# Altium PCB Buck.PcbDoc
Units mm, origin at the board's own origin, x right, y up, seen from the top; angles counter-clockwise.
Board outline 93.22 x 41.27 mm, 4 copper layers (Top Layer, Layer 1, Layer 2, Bottom Layer), stack 1.575 mm thick; 46 components, 20 nets, 113 pads, 11 vias.
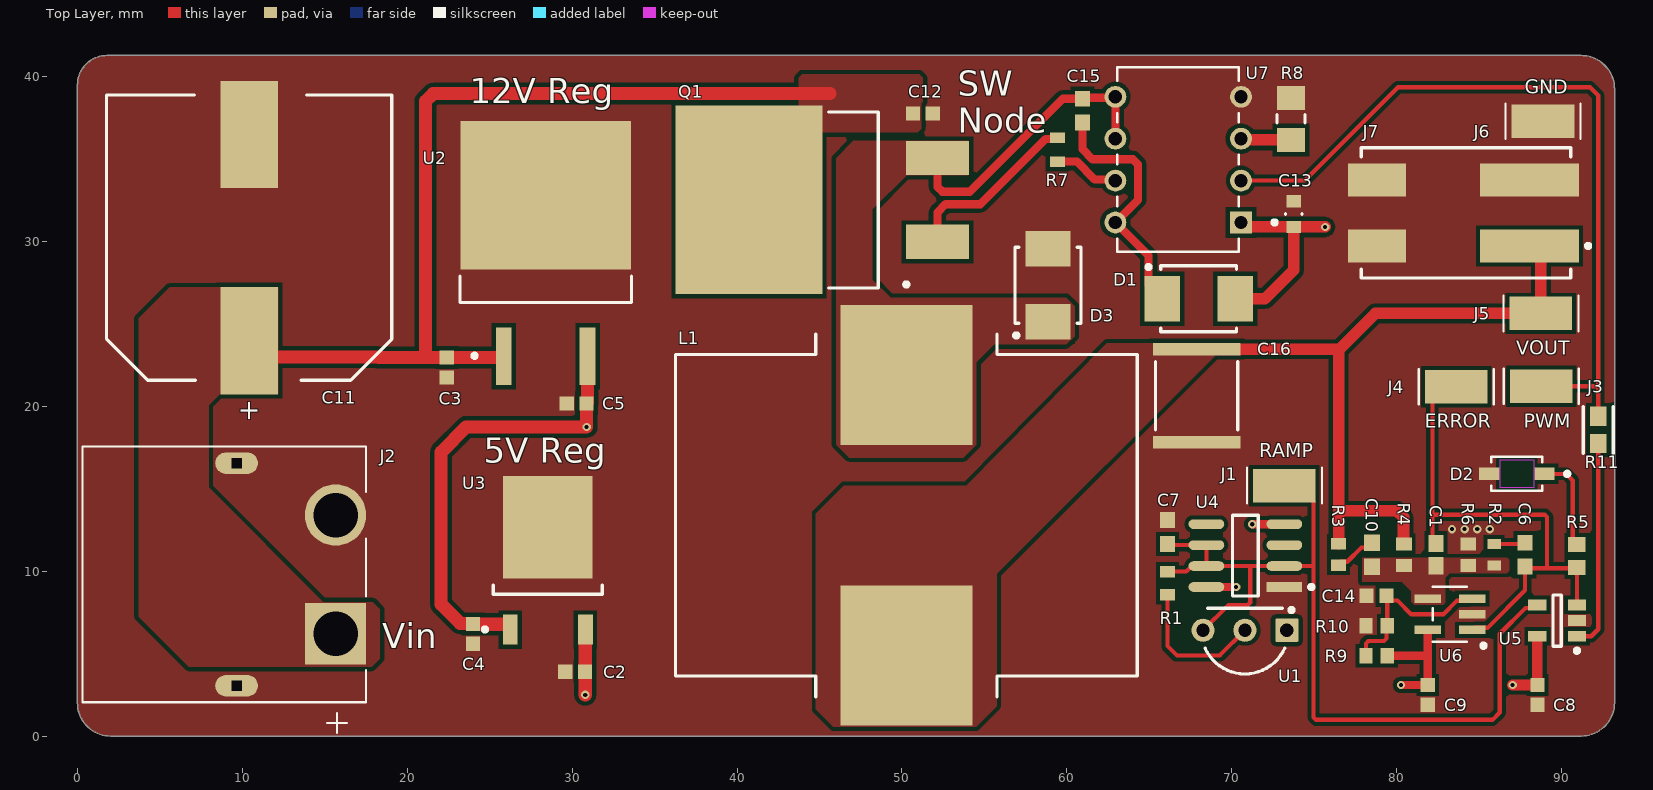
[diagram p0: Top Layer view]
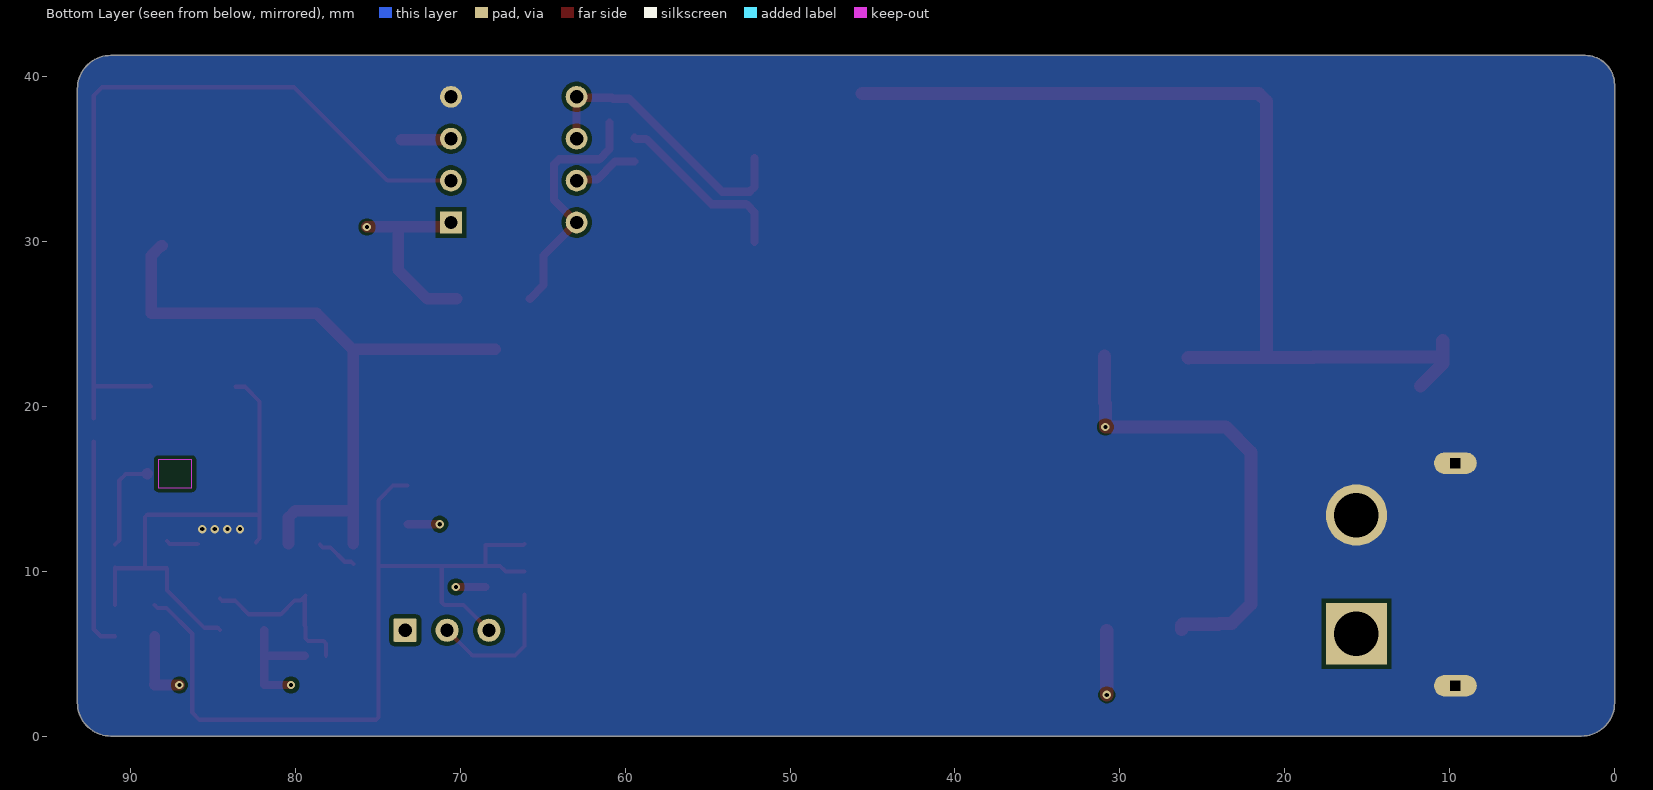
[diagram p1: Bottom Layer view, seen from below]
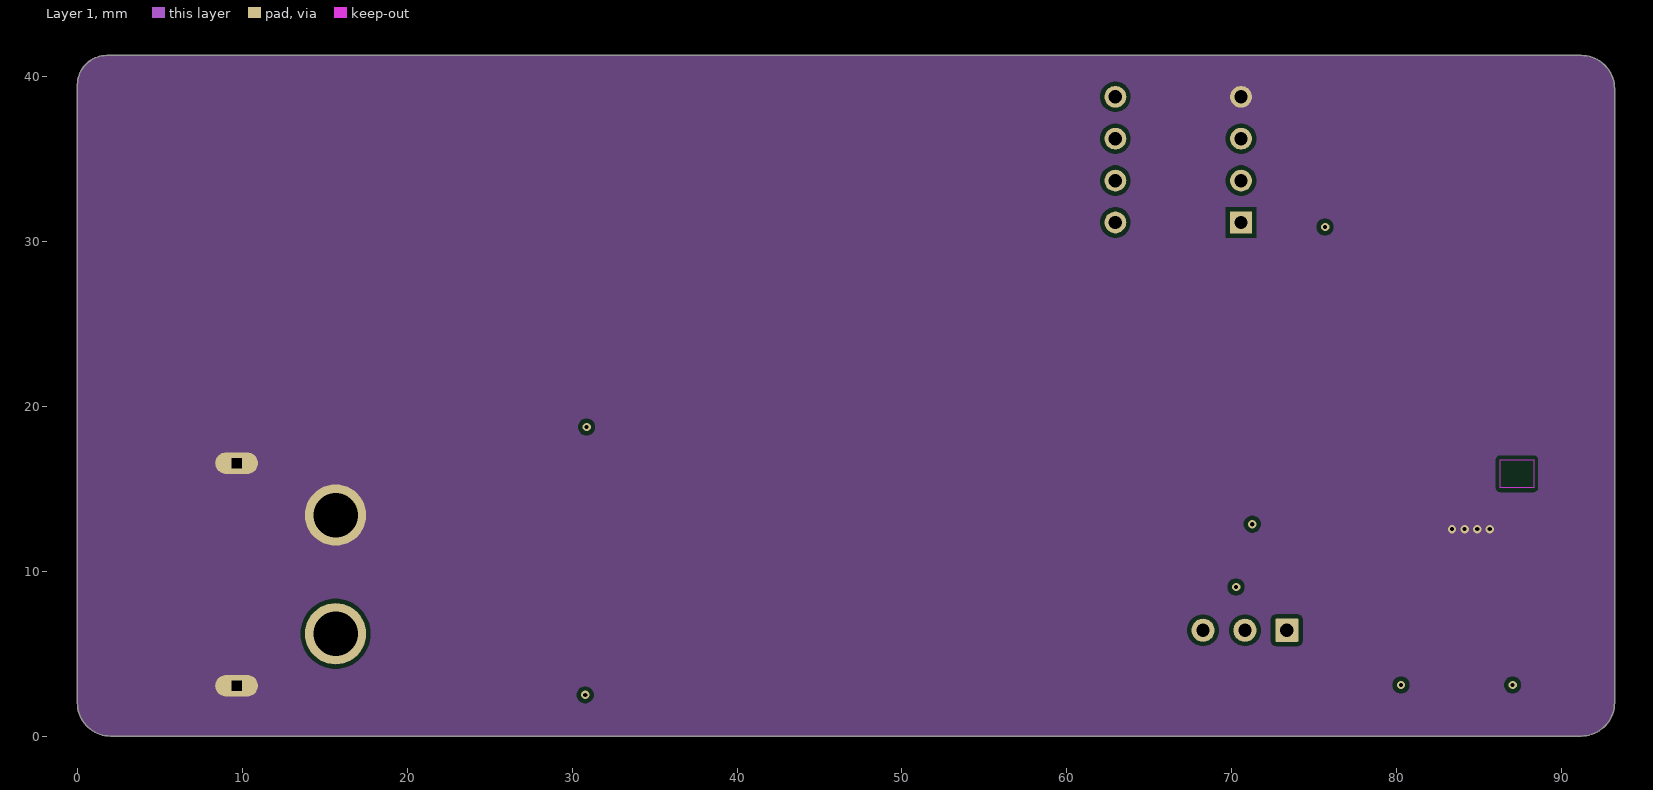
[diagram p2: Layer 1]
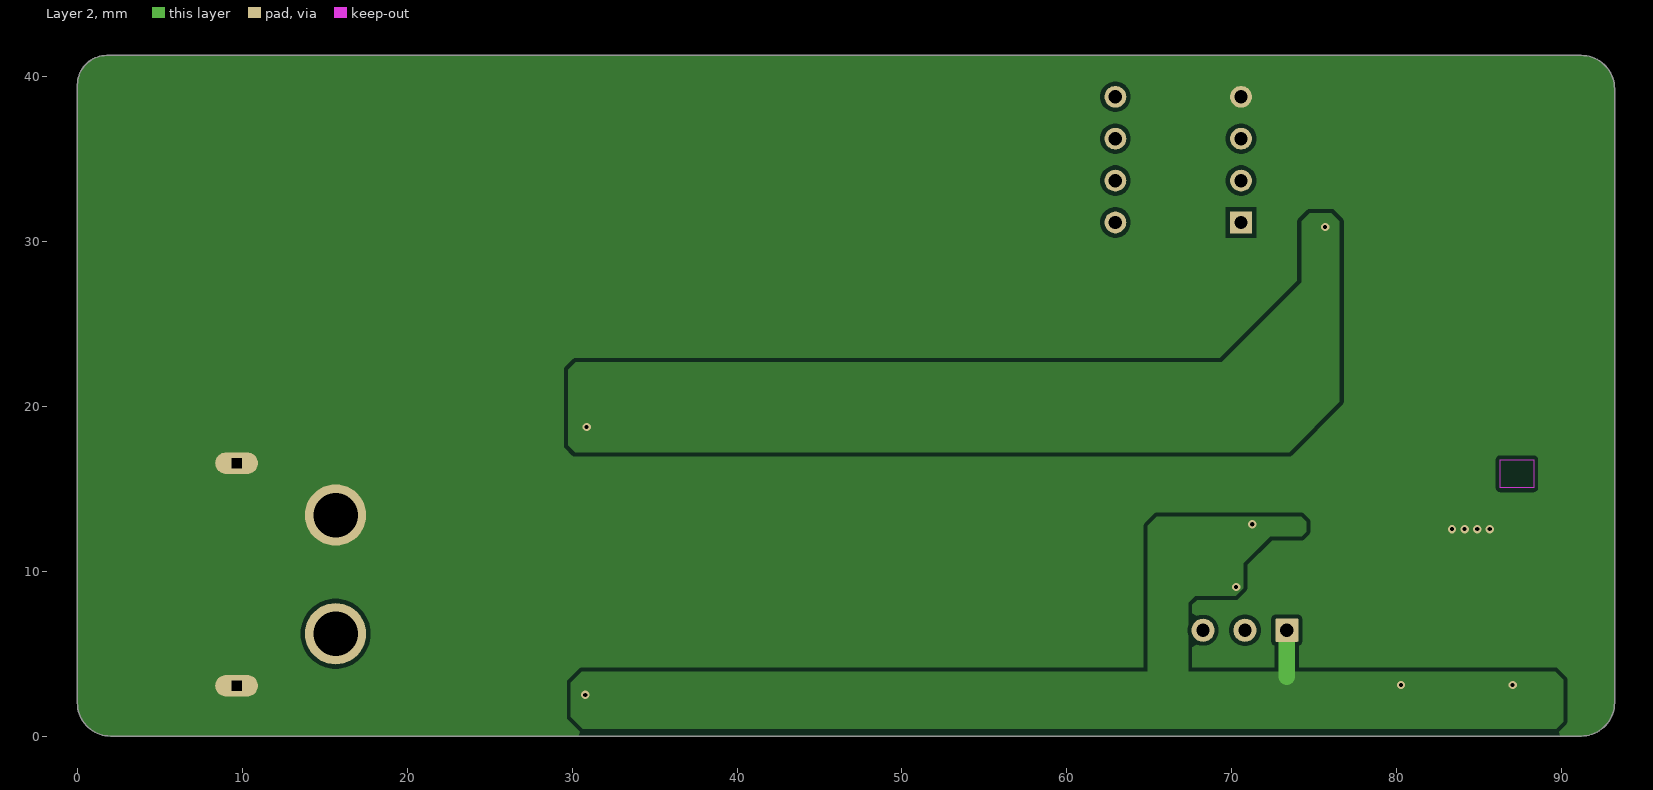
[diagram p3: Layer 2]
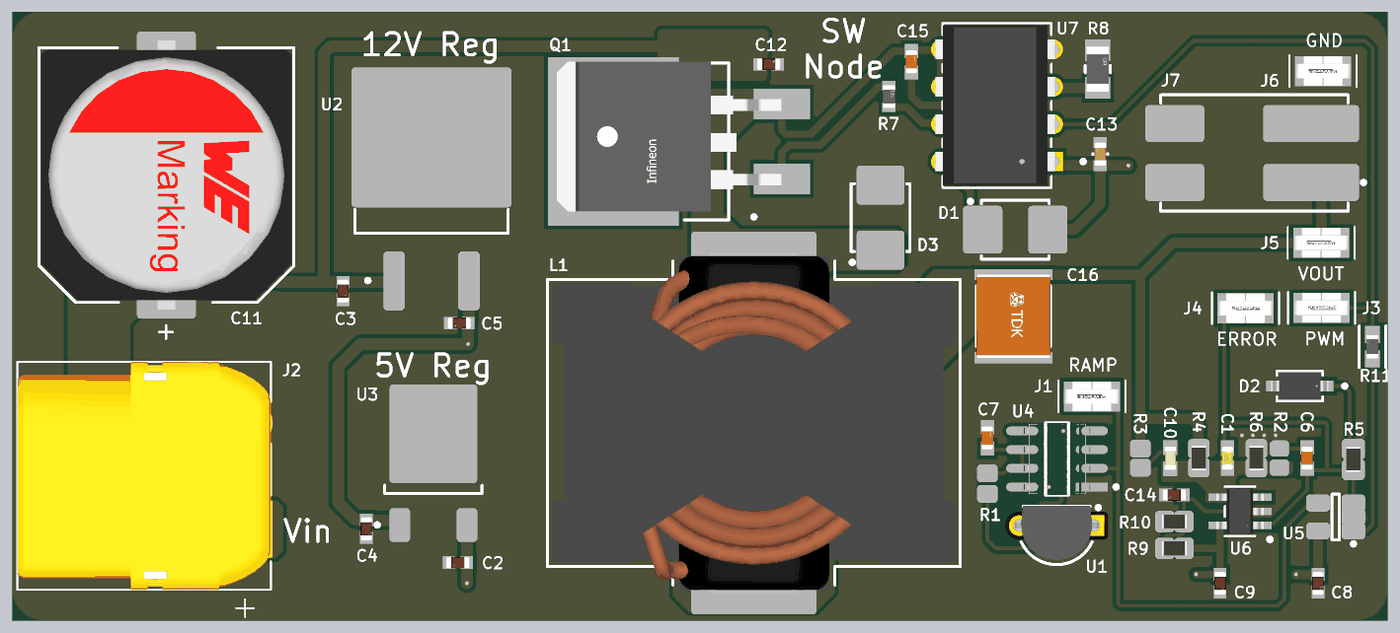
[diagram p4: 3D render of the assembled board from above, using the file's embedded part models]

## Layer stack, top to bottom
Top Solder: solder mask 0.0127, Solder Resist, Dk 3.3
Top Layer: signal copper 0.035
Dielectric 1: prepreg 0.0711, PP-006, Dk 4.1
Layer 1: signal copper 0.035
Dielectric1: core 1.2924, FR-4, Dk 4.3
Layer 2: signal copper 0.035
Dielectric 2: prepreg 0.0711, PP-006, Dk 4.1
Bottom Layer: signal copper 0.035
Bottom Solder: solder mask 0.0127, Solder Resist, Dk 3.3

## Board outline
2.007,0 91.186,0 ccw(c91.186,2.032) 93.218,2.032 93.218,39.243 ccw(c91.186,39.243) 91.186,41.275 1.778,41.275 ccw(c1.778,39.497) 0,39.497 0,2.007 ccw(c2.007,2.007)

## Design rules (kind name [scope] priority, off if disabled: settings)
Clearance [All] p1: gap=0.254 ignorepadtopadclearanceinfootprint=FALSE
DiffPairsRouting [All] p1: maxlimit=0.254 minlimit=0.254 mostfreqgap=0.254 toplayer_minwidth=0.254 toplayer_maxwidth=0.254 toplayer_prefwidth=0.254 midlayer1_minwidth=0.254 midlayer1_maxwidth=0.254 midlayer1_prefwidth=0.254 midlayer2_minwidth=0.254 midlayer2_maxwidth=0.254 midlayer2_prefwidth=0.254 bottomlayer_minwidth=0.254 bottomlayer_maxwidth=0.254 bottomlayer_prefwidth=0.254 maxuncoupledlength=12.7
HoleSize [All] p1: absolutevalues=TRUE maxlimit=7.62 minlimit=0.254 maxpercent=80.000 minpercent=20.000
MinimumAnnularRing [All] p1: minimumring=0.1
MinimumSolderMaskSliver [All] p1: minsoldermaskwidth=0.1
PasteMaskExpansion [All] p1: expansion=0.254
PlaneClearance [All] p1: clearance=0.381
PlaneConnect [All] p1: pad.planeconnectstyle=Relief pad.reliefexpansion=0.508 pad.reliefentries=4 pad.reliefconductorwidth=0.254 pad.reliefairgap=0.254 via.planeconnectstyle=Direct via.reliefexpansion=0.508 via.reliefentries=4 via.reliefconductorwidth=0.254 via.reliefairgap=0.254
PolygonConnect [All] p1: connectstyle=Direct reliefconductorwidth=0.254 reliefentries=4 polygonreliefangle="90 Angle" airgapwidth=0.254
RoutingVias [All] p1: holewidth=0.254 width=0.508 viastyle="Through Hole" minholewidth=0.254 minwidth=0.508 maxholewidth=0.254 maxwidth=0.508
SMDNeckDown [All] p1: percent=100.000
SilkToSilkClearance [All] p1: silktosilkclearance=0.15
SilkToSolderMaskClearance SilkscreenOverComponentPads [OnCopper] p1: minsilkscreentomaskgap=0.04 clearancetoexposedcopper=TRUE
SolderMaskExpansion [All] p1: expansion=0.254 istentingtop=FALSE
SupplyNets "Schematic Supply Nets_5" [InNet('GND')] p1: voltage=0.000
SupplyNets "Schematic Supply Nets_4" [InNet('+5V')] p2: voltage=0.000
SupplyNets "Schematic Supply Nets_2" [InNet('+12V')] p3: voltage=0.000
SupplyNets "Schematic Supply Nets_1" [InNet('Vout')] p4: voltage=0.000
SupplyNets "Schematic Supply Nets" [InNet('Vin')] p5: voltage=0.000
Width [All] p1: maxlimit=2 minlimit=0.254 preferedwidth=0.254
22 further rules are at their usual default settings.

## Components (designator, comment, footprint, x,y, rotation, side; value= is the part's Value field where it differs from the comment)
C1 "CC0603KRX7R9BB103" FP-CC0603-DA-IPC_B 82.398,11 r90 top value=10nF
C2 "UMK107AB7105KA-T" FP-0603-L_1_6_0_15-W_0_8-IPC_C 30.183,3.902 r180 top value=1µF
C3 "UMK107AB7105KA-T" FP-0603-L_1_6_0_15-W_0_8-IPC_C 22.403,22.352 r270 top value=1µF
C4 "UMK107AB7105KA-T" FP-0603-L_1_6_0_15-W_0_8-IPC_C 23.984,6.201 r270 top value=1µF
C5 "UMK107AB7105KA-T" FP-0603-L_1_6_0_15-W_0_8-IPC_C 30.277,20.168 r180 top value=1µF
C6 "GCM188R71C274KA37D" FP-GCM188-0_1-IPC_B 87.794,11 r270 top value=270nF
C7 "GCM1885C1H302FA16J" FP-GCM188-0_1-IPC_B 66.103,12.376 r90 top value=3nF
C8 "UMK107AB7105KA-T" FP-0603-L_1_6_0_15-W_0_8-IPC_C 88.54,2.5 r270 top value=1µF
C9 "UMK107AB7105KA-T" FP-0603-L_1_6_0_15-W_0_8-IPC_C 81.889,2.5 r270 top value=1µF
C10 "C0603C223K5RACTU" FP-C0603C-CF-IPC_B 78.511,11 r270 top value=22nF
C11 "865060663015" WCAP-ASLL_D16H17 10.414,30.225 r270 top value=1mF
C12 "UMK107AB7105KA-T" FP-0603-L_1_6_0_15-W_0_8-IPC_C 51.267,37.752 r0 top value=1µF
C13 "GRT188R61H225KE13D" FP-GRT188-0_2-MFG 73.762,31.648 r90 top
C14 "UMK107AB7105KA-T" FP-0603-L_1_6_0_15-W_0_8-IPC_C 78.787,8.504 r180 top value=1µF
C15 "GCM188R71H224KA64D" FP-GCM188-0_1-IPC_B 60.957,37.927 r90 top value=220nF
C16 "C5750X7R1H226M250KB" FP-C5750-250-0_4-IPC_C 67.874,20.637 r270 top
D1 "MBRS360BT3G" ONSC-SMB-2-403A-03_H_V 67.996,26.518 r0 top
D2 "MMSZ5226BT1G" SOD-123_ONS 87.294,15.9 r180 top
D3 "MBRS360BT3G" ONSC-SMB-2-403A-03_H_V 58.857,27.336 r90 top
J1 "5019" 5019_MFG 73.192,15.189 r180 top
J2 "XT60PW-F" AMASS_XT60PW-F 15.652,9.801 r270 top
J3 "5019" 5019_MFG 88.773,21.209 r0 top
J4 "5019" 5019_MFG 83.617,21.184 r0 top
J5 "5019" 5019_MFG 88.748,25.629 r180 top
J6 "5019" 5019_MFG 88.875,37.287 r180 top
J7 "2060-452/998-404" WAGO-2060-452_V 83.439,31.725 r180 top
L1 "74437529203471" WE-HCF_2920 50.267,13.386 r0 top value=470µH
Q1 "IRF530NSTRLPBF" FP-PG-TO263-3-MFG 43.739,32.51 r90 top
R1 "RC0603FR-0771R5L" RESC1608X55X25NL10T15 66.103,9.269 r270 top
R2 "RC0603JR-07910RL" RESC1608X55X25LL10T15 85.917,11 r90 top
R3 "RK73H1JTTD4300F" RESC1608X55X30LL20T10 76.479,11 r270 top
R4 "CRCW060310K0FKEA" RESC1609X50X30NL8T20 80.444,11 r270 top
R5 "CRCW0603100RFKEA" RESC1609X50X30ML8T20 90.933,10.914 r270 top
R6 "CRCW060310K0FKEA" RESC1609X50X30NL8T20 84.345,11 r90 top
R7 "RMCF0603JT20R0" FP-RMCF0603-MFG 59.432,35.561 r90 top value=20
R8 "RNCP1206FTD10K0" FP-RNCP1206-IPC_B 73.594,37.427 r270 top
R9 "CRCW060310K0FKEA" RESC1609X50X30NL8T20 78.787,4.868 r180 top
R10 "CRCW060310K0FKEA" RESC1609X50X30NL8T20 78.787,6.692 r180 top
R11 "CR0603AFX-1000ELF" FP-CR0603-IPC_A 92.227,18.564 r90 top
U1 "LM334Z/NOPB" LP0003A 70.802,6.417 r270 top
U2 "L7812CD2T-TR" TO-263_L 28.397,29.286 r90 top
U3 "L7805CDT-TR" TO-252_L 28.524,10.657 r90 top
U4 "TLC555CDR" FP-D0008A-IPC_B 70.829,10.944 r180 top
U5 "MCP6561T-E/OT" SOT-23-OT5_N 89.733,7.003 r180 top
U6 "MCP6021T-E/OT" SOT-23-5_MC_MCH-M 83.234,7.386 r180 top
U7 "IR2125PBF" PDIP8_INF 70.566,31.146 r180 top

## Footprints (in the part's own frame and the unit in brackets; to place one, negate y for a bottom-side part, rotate by r counter-clockwise, add the part's x,y. Pads: shape width x height; smd on the part's side, far side on the other; paste and mask are expansions set on the pad)
5019_MFG [mm] "Recommended Land Pattern"
  rect 3.8x2.03 smd paste+0 mask+0: 1(0,0)
  silkscreen extent -2.27,-1.08 2.27,1.08, body extent -1.91,-1.01 1.91,1.01, height 2.42
AMASS_XT60PW-F [mm]
  rect 3.716x3.716 / inner round 3.716 / far side rect 3.716x3.716 hole 2.7 mask+0.102: 1(3.6,0)
  round 3.716 hole 2.7 mask+0.102: 2(-3.6,0)
  oval 1.3x2.6 hole 0.6 square mask+0.102: 3(6.75,-6) 4(-6.75,-6)
  silkscreen extent -7.75,-15.35 9.6,1.85, body extent -7.75,-15.35 7.75,1.85, height 8.4
FP-0603-L_1_6_0_15-W_0_8-IPC_C [mm]
  rect 0.858x0.862 smd paste+0 mask+0: 1(-0.602,0) 2(0.602,0)
  body extent -1.13,-0.58 1.13,0.58, height 0.25
FP-C0603C-CF-IPC_B [mm]
  rect 1.007x0.958 smd paste+0 mask+0: 1(-0.726,0) 2(0.726,0)
  body extent -1.48,-0.73 1.48,0.73, height 0.25
FP-C5750-250-0_4-IPC_C [mm]
  rect 0.753x5.303 smd paste+0 mask+0: 1(-2.825,0) 2(2.825,0)
  silkscreen extent -2.07,-2.5 2.07,2.5, body extent -3.3,-2.8 3.3,2.8, height 0.25
FP-CC0603-DA-IPC_B [mm]
  rect 1.058x0.912 smd paste+0 mask+0: 1(-0.677,0) 2(0.677,0)
  body extent -1.46,-0.71 1.46,0.71, height 0.25
FP-CR0603-IPC_A [mm]
  rect 1.158x1.012 smd paste+0 mask+0: 1(-0.827,0) 2(0.827,0)
  silkscreen extent -1.41,-0.91 1.41,0.91, body extent -1.91,-1.01 1.91,1.01, height 0.25
FP-D0008A-IPC_B [mm]
  rect 2.169x0.582 smd paste+0 mask+0: 1(-2.364,1.905)
  rrect100% 2.169x0.582 smd paste+0 mask+0: 2(-2.364,0.635) 3(-2.364,-0.635) 4(-2.364,-1.905) 5(2.364,-1.905) 6(2.364,-0.635) 7(2.364,0.635) 8(2.364,1.905)
  silkscreen extent -4.12,-2.45 0.78,2.45, body extent -3,-2.45 3,2.45, height 1.75
FP-GCM188-0_1-IPC_B [mm]
  rect 0.959x0.912 smd paste+0 mask+0: 1(-0.727,0) 2(0.727,0)
  body extent -1.46,-0.71 1.46,0.71, height 0.25
FP-GRT188-0_2-MFG [mm]
  rect 0.75x0.9 smd paste+0 mask+0: 1(-0.775,0) 2(0.775,0)
  silkscreen extent -0.03,-0.5 0.03,0.5, body extent -1.25,-0.6 1.25,0.6, height 0.25
FP-PG-TO263-3-MFG [mm]
  rect 2.08x3.81 smd paste+0 mask+0: 1(-2.54,-8.417) 2(2.54,-8.417)
  rect 11.43x8.89 smd paste+0 mask+0: 3(0,3.013)
  silkscreen extent -5.34,-4.82 5.34,-1.81, body extent -5.81,-10.42 5.81,7.56, height 0.25
FP-RMCF0603-MFG [mm]
  rect 0.65x0.9 smd paste+0 mask+0: 1(-0.725,0) 2(0.725,0)
  body extent -1.15,-0.58 1.15,0.58, height 0.25
FP-RNCP1206-IPC_B [mm]
  rect 1.454x1.706 smd paste+0 mask+0: 1(-1.276,0) 2(1.276,0)
  silkscreen extent -0.25,-0.85 0.25,0.85, body extent -1.55,-0.75 1.55,0.75, height 0.65
LP0003A [mm] "TO, Flat Index; 3 In-Line, Formed Axial Leads; Body Dia. 4.8mm; Leads 0.56 x 0.41 mm (max)"
  rrect7% 1.4x1.4 hole 0.8: 1(0,2.54)
  round 1.4 hole 0.8: 2(0,0) 3(0,-2.54)
  silkscreen extent -1.35,-2.41 2.65,2.95, body extent -1.33,-2.83 2.35,2.83, height 9.01
ONSC-SMB-2-403A-03_H_V [mm] "Molded, 2-Leads, Body 4.6x3.95mm"
  rect 2.159x2.743 smd: 1(-2.21,0) 2(2.21,0)
  silkscreen extent -3.16,-2 2.3,2.05, body extent -2.3,-1.97 2.3,1.97, height 2.42
PDIP8_INF [mil]
  rect 52x52 hole 32 paste-99999 mask+0: 1(0,0)
  round 52 hole 32 paste-99999 mask+0: 2(0,-100) 3(0,-200) 4(0,-300) 5(300,-300) 6(300,-200) 7(300,-100) 8(300,0)
  silkscreen extent -85,-370 295,70, body extent -5,-365 315,65, height 215
RESC1608X55X25LL10T15 [mm] "Chip Resistor, 2-Leads, Body 1.60x0.80mm, IPC High Density"
  rect 0.6x0.8 smd: 1(-0.65,0) 2(0.65,0)
  body extent -0.85,-0.45 0.85,0.45, height 0.55
RESC1608X55X25NL10T15 [mm] "Chip Resistor, 2-Leads, Body 1.60x0.80mm, IPC Medium Density"
  rect 0.7x0.9 smd: 1(-0.7,0) 2(0.7,0)
  body extent -0.85,-0.45 0.85,0.45, height 0.55
RESC1608X55X30LL20T10 [mm] "Chip Resistor, 2-Leads, Body 1.60x0.80mm, IPC High Density"
  rect 0.7x0.9 smd: 1(-0.65,0) 2(0.65,0)
  body extent -0.9,-0.5 0.9,0.5, height 0.55
RESC1609X50X30ML8T20 [mm] "Chip Resistor, 2-Leads, Body 1.65x0.95mm, IPC Low Density"
  rect 0.9x1.05 smd: 1(-0.7,0) 2(0.7,0)
  body extent -0.82,-0.48 0.82,0.48, height 0.5
RESC1609X50X30NL8T20 [mm] "Chip Resistor, 2-Leads, Body 1.65x0.95mm, IPC Medium Density"
  rect 0.8x0.95 smd: 1(-0.65,0) 2(0.65,0)
  body extent -0.82,-0.48 0.82,0.48, height 0.5
SOD-123_ONS [mil]
  rect 48x30 smd paste+0 mask+0: 1(-66,0) 2(66,0)
  Keep-Out Layer region: -40,-33.5 -40,33.5 40,33.5 40,-33.5
  silkscreen extent -125,-41 61,41, body extent -76,-36 76,36, height 53
SOT-23-5_MC_MCH-M [mil]
  rect 63.37x20 smd paste+0 mask+0: 1(-52.97,37.4) 2(-52.97,0) 3(-52.97,-37.4) 4(52.97,-37.4) 5(52.97,37.4)
  silkscreen extent -85,-66 41,80, body extent -63,-61 63,61, height 57
SOT-23-OT5_N [mm] "SOT23, 5-Leads, Body 2.9x1.7mm, Pitch 0.95mm, Lead Span 2.8mm, IPC Medium Density"
  rect 1.1x0.65 smd: 1(-1.2,0.95) 2(-1.2,0) 3(-1.2,-0.95) 4(1.2,-0.95) 5(1.2,0.95)
  silkscreen extent -1.33,-1.55 0.25,1.95, body extent -0.9,-1.55 0.9,1.55, height 1.45
TO-252_L [mm] "D-PAK, 4-Leads, Body 6.1x6.5mm, Pitch 2.28mm, Lead Span 9.7mm, IPC High Density"
  rect 1.8x0.9 smd: 1(-4.2,2.28) 2(-4.2,-2.28)
  rect 6.2x5.45 smd: 3(2,0)
  silkscreen extent -4.32,-3.3 -1.5,3.93, body extent -2.05,-3.3 4.15,3.3, height 2.4
TO-263_L [mm] "D2-PAK, 4-Leads, Body 9.2x10.2mm, Pitch 2.54mm, Lead Span 15.4mm, IPC High Density"
  rect 3.5x0.95 smd: 1(-6.25,2.54) 2(-6.25,-2.54)
  rect 9x10.35 smd: 3(3.5,0)
  silkscreen extent -6.35,-5.2 -1.4,5.2, body extent -3,-5.2 6.35,5.2, height 4.6
WAGO-2060-452_V [mm] "Terminal Block, 2-Leads, Body 12.7x7.9mm, Pitch 4mm"
  rect 6x2 smd: 1(-4.625,2) 2(-4.625,-2)
  rect 3.5x2 smd: MP1(4.625,2) MP2(4.625,-2)
  silkscreen extent -8.3,-3.95 5.58,3.95, body extent -7.12,-3.95 5.58,3.95, height 4.5
WCAP-ASLL_D16H17 [mm] "Aluminium Electrolytic V-Chip SMT Capacitors, 16x17mm"
  rect 6.5x3.5 smd: 1(6.25,0) 2(-6.25,0)
  silkscreen extent -8.65,-8.65 8.65,8.65, body extent -9.15,-8.5 9.15,8.5, height 17.05
WE-HCF_2920 [mm] "SMD High Current Inductor, body 28x25mm"
  rect 8x8.5 smd: 1(0,8.5) 2(0,-8.5)
  silkscreen extent -14,-11 14,14.12, body extent -13.65,-11.55 13.65,11.55, height 20

## Part data
C1: library part CMP-001-00087-2, "50V 10nF X7R ±10% 0603 Multilayer Ceramic Capacitors MLCC - SMD/SMT ROHS", Case Code (Imperial)=0603, Case Code (Metric)=1608, Dielectric=X7R, Dielectric Material=Ceramic, Insulation Resistance=100GΩ, Max Operating Temperature=125°C, Min Operating Temperature=-55°C, Tolerance=10%, Voltage=50V, Case/Package=0603, China RoHS=Compliant, Composition=Ceramic, Country of Origin="Mainland China, Taiwan", Depth=800µm, Export Control Classification Number (ECCN) Code=EAR99, Halogen Free="Halogen Free", Harmonized Tariff Schedule (HTS) Code=8532.24.00.20, Height=800µm, Introduction Date=2003-01-27, Lead Free="Lead Free", Length=1.6mm, Lifecycle Status=Production, Material=Ceramic, Mounting Technology="Surface Mount", Number of Terminals=2, Pins=2, Radiation Hardening=No, REACH SVHC=Unaffected, RoHS=Compliant, Schedule B="8532240020, 8532240020", Termination=SMD/SMT, Thickness=889µm, Voltage Rating=50V, Voltage Rating (DC)=50V, Width=800µm
C2 C3 C4 C5 C8 C9 C12 C14: library part CMP-001-00089-1, "50V 1uF X7R 卤10% 0603 Multilayer Ceramic Capacitors MLCC - SMD/SMT ROHS", Case Code (Imperial)=0603, Case Code (Metric)=1608, Dielectric=X7R, Dielectric Material=Ceramic, Max Operating Temperature=125°C, Min Operating Temperature=-55°C, Tolerance=10%, Voltage Rating=50V, Case/Package=0603, Depth=800µm, Halogen Free="Halogen Free", Height=800µm, Length=1.6mm, Lifecycle Status=Production, Material=Ceramic, Mounting Technology="Surface Mount", Number of Terminals=2, Radiation Hardening=No, REACH SVHC=Unaffected, RoHS=Compliant, Termination=SMD/SMT, Thickness=939.8µm, Voltage Rating (DC)=50V, Width=800µm
C6: library part CMP-001-00091-1, "Cap Ceramic 0.27uF 16V X7R 10% Pad SMD 0603 125C Automotive T/R", Case/Package=0603, Dielectric=X7R, Dielectric Material=Ceramic, Manufacturer Lifecycle Status="IN PRODUCTION", Max Operating Temperature=125°C, Min Operating Temperature=-55°C, Ratings=AEC-Q200, Tolerance=10%, Voltage Rating=16V, Country of Origin=Philippines, Export Control Classification Number (ECCN) Code=EAR99, Harmonized Tariff Schedule (HTS) Code=8532.24.00.20, Height=800µm, Introduction Date=2010-10-29, Length=1.6mm, Lifecycle Status=Production, Material=Ceramic, Mounting Technology="Surface Mount", Number of Terminals=2, REACH SVHC=Unaffected, RoHS=Compliant, Schedule B="8532240020, 8532240020", Thickness=800µm, Voltage Rating (DC)=16V, Width=800µm
C7: library part CMP-001-00090-1, "MLCC 3nF ±1% C0G(NP0) 0603 SMD, Adhesive Mount 1.6mm × 800μm × 800μm", Case/Package=0603, Dielectric Material=Ceramic, Manufacturer Lifecycle Status="IN PRODUCTION", Max Operating Temperature=125°C, Min Operating Temperature=-55°C, Ratings=AEC-Q200, Temperature Coefficient=30ppm/°C, Tolerance=1%, Voltage Rating=50V, Height=800µm, Length=1.6mm, Lifecycle Status=Production, Material=Ceramic, Mounting Technology="Surface Mount", Number of Terminals=2, REACH SVHC=Unaffected, RoHS=Compliant, Thickness=800µm, Voltage Rating (DC)=50V, Width=800µm
C10: library part CMP-001-00092-1, "CAP CER 0.022UF 50V X7R 0603 / 0.022 µF ±10% 50V Ceramic Capacitor X7R 0603 (1608 Metric)", Case Code (Imperial)=0603, Dielectric=X7R, Dielectric Material=Ceramic, Max Operating Temperature=125°C, Min Operating Temperature=-55°C, Temperature Coefficient=30ppm/°C, Tolerance=10%, Voltage=50V, Case/Package=0603, China RoHS=Compliant, Contact Plating=Tin, Country of Origin=Mexico, Depth=800µm, Dissipation Factor=2.5%, Export Control Classification Number (ECCN) Code=EAR99, Harmonized Tariff Schedule (HTS) Code=8532.24.00.20, Height=800µm, Introduction Date=2011-08-12, Lead Free="Lead Free", Lead Pitch=700µm, Length=1.6mm, Lifecycle Status=Production, Material=Ceramic, Mounting Technology="Surface Mount", Number of Terminals=2, Packaging="Cut Tape", Pins=2, Radiation Hardening=No, REACH SVHC=Unaffected, RoHS=Compliant, Schedule B="8532240020, 8532240020", Termination=SMD/SMT, Thickness=863.6µm, Voltage Rating=50V, Voltage Rating (DC)=50V, Width=800µm
C11: library part CMP-001-00088-3, "Alum. Electrolytic Cap 1000UF 50V 17MMV-CHIP Wcap-asll, Lifetime 5000H +105OC", Case/Package=Radial, ESR (Equivalent Series Resistance)=55.6696mΩ, Insulation Resistance=100kΩ, Leakage Current=500µA, Manufacturer Lifecycle Status=ACTIVE, Max Operating Temperature=105°C, Min Operating Temperature=-55°C, Ripple Current=1.61A, Tolerance=20%, Voltage Rating=50V, Diameter=16mm, Height=17mm, Height - Seated (Max)=16.9926mm, Impedance=73mΩ, Length=17mm, Life (Hours)=5000hours, Lifecycle Status=Production, Mounting Technology="Surface Mount", Polarity=Polar, REACH SVHC=Unknown, Ripple Current (AC)=1.61A, RoHS=Compliant, Voltage Rating (DC)=50V, Width=17.1mm, YEOL="1 = Estimated lifetime > 10 years"
C13: library part CMP-06035-008514-1, "Multi-Layer Ceramic Capacitor 2.2uF 50V X5R ±10% 0603 Paper T/R", Capacitance=2.2uF, Case Code (Imperial)=0603, Case Code (Metric)=1608, Dielectric=X5R, Max Operating Temperature=85°C, Min Operating Temperature=-55°C, Ratings=AEC-Q200, Tolerance=10%, Voltage Rating=50V, Case/Package=0603, Length=0.063inch, Mount="Surface Mount", Packaging="Tape and Reel", Thickness=0.035inch, Voltage Rating (DC)=50V, Width=0.031inch
C15: library part CMP-001-00093-1, "50V 220nF X7R ±10% 0603 Multilayer Ceramic Capacitors MLCC - SMD/SMT ROHS", Case Code (Imperial)=0603, Case Code (Metric)=1608, Dielectric=X7R, Dielectric Material=Ceramic, Manufacturer Lifecycle Status="IN PRODUCTION", Max Operating Temperature=125°C, Min Operating Temperature=-55°C, Ratings=AEC-Q200, Tolerance=10%, Voltage=50V, Case/Package=0603, Country of Origin="Japan, Philippines", Depth=800µm, Export Control Classification Number (ECCN) Code=EAR99, Harmonized Tariff Schedule (HTS) Code=8532.24.00.20, Height=800µm, Introduction Date=2010-10-29, Lead Free="Lead Free", Length=1.6mm, Lifecycle Status=Production, Material=Ceramic, Mounting Technology="Surface Mount", Number of Terminals=2, Packaging="Tape & Reel", Radiation Hardening=No, REACH SVHC=Unaffected, RoHS=Compliant, Schedule B="8532240020, 8532240020", Termination=SMD/SMT, Voltage Rating=50V, Voltage Rating (DC)=50V, Width=800µm
C16: library part CMP-08246-002715-1, "Multilayer Ceramic Capacitors 22uF ±20% 50V X7R SMD 2220"
D1 D3: library part CMP-004-00033-2, "Rectifier Diode, Schottky, 1 Phase, 1 Element, 3A, 60V V(RRM), Silicon, DO-214AA", Average Rectified Current=3A, Case/Package=SMB, Forward Voltage=630mV, Manufacturer Lifecycle Status=ACTIVE, Max Forward Surge Current (Ifsm)=125A, Max Operating Temperature=175°C, Max Repetitive Reverse Voltage (Vrrm)=60V, Max Reverse Leakage Current=150µA, Min Operating Temperature=-65°C, Peak Reverse Current=30µA, China RoHS=Non-Compliant, Contact Plating=Tin, Element Configuration=Single, Halogen Free="Halogen Free", Height=2.27mm, Lead Free="Lead Free", Length=4.6mm, Lifecycle Status=Production, Max Output current=3A, Max Reverse Voltage (DC)=60V, Max Surge Current=125A, Number of Elements=1, Number of Terminals=2, Packaging="Tape and Reel", Peak Non-Repetitive Surge Current=125A, Pins=2, Radiation Hardening=No, REACH SVHC=Affected, Reverse Standoff Voltage=60V, RoHS=Compliant, Schedule B=8541100080, Width=3.95mm
D2: library part CMP-004-00032-3, "MMSZ5226BT1 Series 500 mW 10 mA 3.3 V SMT Zener Voltage Regulator - SOD-123", Breakdown Voltage=3.47V, Case/Package=SOD-123-2, Forward Voltage=900mV, Manufacturer Lifecycle Status=ACTIVE, Max Operating Temperature=150°C, Max Power Dissipation=500mW, Max Reverse Leakage Current=25µA, Min Operating Temperature=-55°C, Reference Voltage=3.3V, Test Current=20mA, Tolerance=5%, China RoHS=Compliant, Composition=Zener, Contact Plating=Tin, ESD Protection=Yes, Height=1.12mm, Impedance=28Ω, Lead Free="Lead Free", Length=2.69mm, Lifecycle Status=Production, Material=Plastic, Number of Elements=1, Number of Terminals=2, Packaging="Tape and Reel", Peak Reverse Current=25µA, Pins=2, Polarity=Unidirectional, Power Dissipation=500mW, Power Rating=500mW, Radiation Hardening=No, REACH SVHC=Unaffected, RoHS=Compliant, Schedule B="8541100050, 8541100050", Voltage Rating (DC)=3.3V, Voltage Tolerance=5%, Width=1.6mm, Working Voltage=3.3V, Zener Current=20mA, Zener Voltage=3.3V
J1 J3 J4 J5 J6: library part CMP-1672-00008-3, "Phosphor Bronze Contact Miniature Silver Plated Surface Mount Test Points", China RoHS=Compliant, ComponentLink1Description="Manufacturer's Website", ComponentLink1URL=http://www.keyelco.com/, ComponentLink2Description="Datasheet URL", ComponentLink2URL=https://www.keyelco.com/product-pdf.cfm?p=1357, Contact Material=Silver, Contact Plating=Silver, Height=2.42mm, HelpURL=https://www.keyelco.com/product-pdf.cfm?p=1357, Lead Free="Lead Free", Lifecycle Status=Production, Material=Bronze, Mount="Surface Mount", Number of Contacts=1, Number of Pins=1, Packaging="Tape and Reel", REACH SVHC=Yes, RoHS=Compliant, Termination=SMD/SMT
J2: library part CMP-002-00074-1, "Screw Type Terminal", Color=Yellow, Contact Material=Brass, Gender=Female, Mounting Technology="Through Hole", Pins=4
J7: library part CMP-2000-05527-1, "Terminal Block, Pitch 4 mm, 1 x 2 Position, Height 4.5 mm, -60 to 105 degC, RoHS, Tape and Reel", Colour=White, Manufacturer=WAGO, Nominal current=9A, Nominal voltage=160V, Package Description="Terminal Block, Pitch 4 mm, 1 x 2 Position, Height 4.5 mm", Package Reference=2060-452, AWG=24-18, Connection=Pullspring, Contact Material=Tinplated, Content=1pc(s), Datasheet URL=http://www.wago.com/infomaterial/pdf/60255126.pdf, Datasheet Version=03/2015, Height=4.5mm, Length=7.9mm, Manufacturer part No.=2060-452/998-404, Manufacturer URL=http://global.wago.com/en/index-en.jsp, Material=PPA-GFenclosure·Tin-platedcoppercontacts, Max. cross section (flexible)=0.75mm², Max. cross section (inflexible)=0.75mm², Min. cross section (flexible)=0.25mm², Min. cross section (unflexible)=0.2mm², Mounting Technology=SurfaceMount, Number of Contacts=2, Pitch=4mm, Stripping length=6-7mm, TYPE=2060-452/998-404, Width=10.1mm
L1: library part CMP-006-00021-7, "Power Choke Shielded Wirewound 470uH 20% 100KHz Ferrite 5.5A 0.0918Ohm DCR Tray Automotive AEC-Q200", Ambient Temperature Range High=75°C, Ambient Temperature Range Low=-40°C, DC Resistance (DCR)=83.45mΩ, Inductance Tolerance=20%, Manufacturer Lifecycle Status=ACTIVE, Max Operating Temperature=125°C, Saturation Current=3.2A, Height=20.5mm, Length=25mm, Lifecycle Status=Production, Min Operating Temperature=-40°C, RoHS=Compliant, Width=28mm, YEOL="1 = Estimated lifetime > 10 years"
Q1: library part CMP-013-00035-1, "Mosfet, Power; N-ch; Vdss 100V; Rds(on) 90MILLIOHMS; Id 17A; D2PAK; Pd 70W; Vgs +/-20V", Case/Package=D2PAK, Continuous Drain Current (ID)=17A, Drain to Source Breakdown Voltage=100V, Drain to Source Resistance=90mΩ, Gate to Source Voltage (Vgs)=20V, Input Capacitance=920pF, Max Junction Temperature (Tj)=175°C, Max Power Dissipation=70W, Min Operating Temperature=-55°C, Package Quantity=800, Power Dissipation=3.8W, Threshold Voltage=4V, China RoHS=Non-Compliant, Contact Plating=Tin, Country of Origin="Mainland China", Current Rating=17A, Drain to Source Voltage (Vds)=100V, Element Configuration=Single, Export Control Classification Number (ECCN) Code=EAR99, Fall Time=25ns, Harmonized Tariff Schedule (HTS) Code=8541.29.00.95, Height=5.084mm, Introduction Date=2007-08-18, Lead Free="Lead Free", Length=10.668mm, Lifecycle Status=Production, Max Operating Temperature=175°C, Min Breakdown Voltage=100V, Mounting Technology="Surface Mount", Nominal Vgs=4V, Number of Channels=1, Number of Elements=1, Number of Terminals=2, On-State Resistance=90mΩ, Pins=3, Radiation Hardening=No, Rds On Max=90mΩ, REACH SVHC=Affected, Rise Time=22ns, RoHS=Compliant, Schedule B="8541290080, 8541290080", Turn-Off Delay Time=35ns, Turn-On Delay Time=9.2ns, Voltage Rating (DC)=100V, Width=9.65mm
R1: library part CMP-2000-04126-1, Manufacturer=Yageo, Part Number=RC0603FR-0771R5L
R2: library part CMP-2000-04296-1, Manufacturer=Yageo, Part Number=RC0603JR-07910RL
R3: library part CMP-2000-01500-1, Manufacturer="KOA Speer", Part Number=RK73H1JTTD4300F
R4 R6 R9 R10: library part CMP-1666-00005-4, "Chip Resistor, 10 KOhm, +/- 1%, 100 mW, -55 to 155 degC, 0603 (1608 Metric), RoHS, Tape and Reel", Manufacturer="Vishay Semiconductor", Max Operating Temperature="155 degC", Min Operating Temperature="-55 degC", Package Quantity=5000, Voltage Rating="75 V", ComponentLink1Description="Manufacturer URL", ComponentLink1URL=http://www.vishay.com/, ComponentLink2Description=Datasheet, ComponentLink2URL=https://datasheet.ciiva.com/11809/0900766b80d98afc-11809037.pdf, DatasheetVersion=06/2012, Height="0.45 mm", Length="1.55 mm", Mounting Technology="Surface Mount", PackageDescription="2-Pin Surface Mount Device, Body 1.575 x 0.85 mm", PackageReference=0603, Packaging="Tape and Reel", REACH SVHC=Unknown, RoHSCompliant=true
R5: library part CMP-2000-03824-5, "Chip Resistor, 100 Ohm, +/- 1%, 100 mW,-55 to 155 degC, 0603 (1608 Metric), RoHS, Tape and Ree", Manufacturer="Vishay Semiconductor", ComponentLink1Description="Manufacturer URL", ComponentLink1URL=http://www.vishay.com/, ComponentLink2Description=Datasheet, ComponentLink2URL=http://www.vishay.com/docs/20035/dcrcwe3.pdf, DatasheetVersion=06/2012, Mounting Technology="Surface Mount", PackageDescription="2-Pin Surface Mount Device, Body 1.575 x 0.85 mm", PackageReference=0603
R7: library part CMP-009-00177-1, "Res Thick Film 0603 20 Ohm 5% 0.1W(1/10W) ±200ppm/C Pad SMD T/R Automotive AEC-Q200", Case Code (Imperial)=0603, Case Code (Metric)=1608, Max Operating Temperature=155°C, Max Power Dissipation=100mW, Min Operating Temperature=-55°C, Ratings=AEC-Q200, Temperature Coefficient=100ppm/°C, Tolerance=5%, Voltage Rating=75V, Case/Package=0603, China RoHS=Non-Compliant, Composition="Thick Film", Contact Plating=Tin, Country of Origin="Japan, Mainland China, Taiwan", Export Control Classification Number (ECCN) Code=EAR99, Features="Automotive AEC-Q200", Harmonized Tariff Schedule (HTS) Code=8533.21.00.30, Height=450µm, Introduction Date=2011-01-07, Lead Free="Lead Free", Length=1.55mm, Lifecycle Status=Production, Mounting Technology="Surface Mount", Number of Terminals=2, Number of Terminations=2, Packaging=Digi-Reel®, Power Rating=100mW, Radiation Hardening=No, REACH SVHC=Unaffected, RoHS=Compliant, Schedule B="8533210045, 8533210045", Width=800µm, Working Voltage=75V
R8: library part CMP-26527-005574-1, "10kΩ ±1% 0.5W 1206 High Power Anti-Sulfur Thin Film Chip Resistor", Case Code (Imperial)=1206, Case Code (Metric)=3216, Max Operating Temperature=155°C, Max Power Dissipation=500mW, Min Operating Temperature=-55°C, Resistance=10kR, Resistor Type="Thin Film", Temperature Coefficient=100ppm/°C, Tolerance=1%, Case/Package=1206, Features="Moisture Resistant", Height=0.024inch, Length=0.122inch, Mount="Surface Mount", Number of Terminations=2, Packaging="Tape and Reel", RoHS Compliant=Yes, Series=RNCP, Width=0.059inch
R11: library part CMP-07231-000376-1, "AEC-Q200 Compliant Chip Resistors 0603 100Ω 0.1W 1% 100ppm/°C"
U1: library part CMP-019-00049-1, "Power Management ICs (PMICs); LM334Z/NOPB; TEXAS INSTRUMENTS; 3; 5.34 mm; 4.3 mm; TO-92", Case/Package=TO-92, Forward Current=10mA, Forward Voltage=40V, Manufacturer Lifecycle Status=ACTIVE, Max Operating Temperature=70°C, Max Power Dissipation=400mW, Min Input Voltage=1V, Min Operating Temperature=0°C, Min Supply Voltage=800mV, Quiescent Current=1µA, Tolerance=3%, Accuracy=3%, Contact Plating=Tin, Element Configuration=Single, Height=5.34mm, Lead Free="Lead Free", Length=4.3mm, Lifecycle Status=Production, Max Supply Voltage=40V, Mounting Technology="Through Hole", Number of Outputs=1, Output Current=10mA, Output Type=ANALOG, Packaging=Box, Pins=3, Radiation Hardening=No, REACH SVHC=Unaffected, RoHS=Compliant, Schedule B="8542390000, 8542390000", Thickness=3.6mm, Weight=453.59237mg, Width=4.3mm
U2: library part CMP-019-00050-1, "STMicroelectronics Linear Regulator IC, 12V Out, 1.5A Max, Single Out, D2PAK, SMD, 3-Pin", Case/Package=TO-263, Dropout Voltage=2V, Max Junction Temperature (Tj)=125°C, Max Output current=1.5A, Max Supply Voltage=25V, Min Input Voltage=14.5V, Min Operating Temperature=-40°C, Output Voltage=12V, Power Supply Rejection Ratio (PSRR)=55dB, Quiescent Current=8mA, Voltage Tolerance=4%, China RoHS=Non-Compliant, Contact Plating=Tin, Country of Origin="Mainland China", Export Control Classification Number (ECCN) Code=EAR99, Harmonized Tariff Schedule (HTS) Code=8542.39.00.60, Height=4.6mm, Height - Seated (Max)=4.83mm, Introduction Date=1980-01-04, Lead Free="Lead Free", Length=10.2mm, Lifecycle Status=Production, Max Operating Temperature=125°C, Mounting Technology="Surface Mount", Number of Channels=1, Number of Circuits=1, Number of Outputs=1, Number of Regulators=1, Number of Terminals=2, Output Current=1.5A, Output Type=Fixed, Packaging="Tape and Reel", Pins=3, Polarity=Positive, Radiation Hardening=No, REACH SVHC=Affected, RoHS=Compliant, Schedule B="8542390000, 8542390000", Terminal Pitch=2.54mm, Weight=4.535924g, Width=9.15mm
U3: library part CMP-019-00051-1, "STMicroelectronics Linear Voltage Regulator, 5V Out, 1.5A Max, DPAK, SMD, 3-Pin", Case/Package=TO-252, Dropout Voltage=2V, Max Junction Temperature (Tj)=125°C, Max Output current=1.5A, Max Output Voltage=5.25V, Max Supply Voltage=18V, Min Input Voltage=7V, Min Operating Temperature=-40°C, Min Output Voltage=4.75V, Output Voltage=5V, Power Supply Rejection Ratio (PSRR)=62dB, Quiescent Current=8mA, Voltage Tolerance=4%, China RoHS=Non-Compliant, Contact Plating=Tin, Country of Origin="Mainland China", Export Control Classification Number (ECCN) Code=EAR99, Harmonized Tariff Schedule (HTS) Code=8542.39.00.60, Height=2.4mm, Height - Seated (Max)=2.63mm, Introduction Date=1980-01-04, Lead Free="Lead Free", Length=6.5mm, Lifecycle Status=Production, Max Operating Temperature=125°C, Mounting Technology="Surface Mount", Number of Channels=1, Number of Circuits=1, Number of Outputs=1, Number of Regulators=1, Number of Terminals=2, Output Current=1.5A, Output Type=Fixed, Packaging="Tape and Reel", Pins=3, Polarity=Positive, Radiation Hardening=No, REACH SVHC=Affected, RoHS=Compliant, Schedule B="8542390000, 8542390000", Terminal Pitch=2.28mm, Width=6.1mm
U4: library part CMP-00023-00003-2, "Precision Timer ICs; TLC555CDR; TEXAS INSTRUMENTS; SOIC; Surface Mount; 1; 100 mA", Ambient Temperature Range High=70°C, Case/Package=SOIC, Current Rating=250A, Frequency=2.1MHz, High Level Output Current=-10mA, Low Level Output Current=100mA, Manufacturer Lifecycle Status=ACTIVE, Max Power Dissipation=725mW, Max Supply Voltage=15V, Min Operating Temperature=0°C, Min Supply Voltage=2V, Nominal Supply Current=250µA, Operating Supply Current=360µA, Height=1.75mm, Lead Free="Lead Free", Length=4.9mm, Lifecycle Status=Production, Max Operating Temperature=70°C, Mounting Technology="Surface Mount", Number of Channels=1, Number of Outputs=1, Number of Timers/Counters=1, Pins=8, Power Dissipation=725mW, Quiescent Current=250µA, Radiation Hardening=No, REACH SVHC=Unaffected, RoHS=Compliant, Schedule B="8542390000, 8542390000", Termination=SMD/SMT, Thickness=1.58mm, Weight=72.603129mg, Width=3.91mm
U5: library part CMP-016-00010-1, "Analogue Comparator, Single, High Speed, 1 Channels, 49 ns, 1.8V to 5.5V, SOT-23, 5 Pins", Case/Package=SOT-23, Input Bias Current=1pA, Input Offset Voltage (Vos)=10mV, Manufacturer Lifecycle Status=REL, Max Operating Temperature=125°C, Max Supply Current=130µA, Max Supply Voltage=5.5V, Min Operating Temperature=-40°C, Min Supply Voltage=1.8V, Natural Thermal Resistance=256°C/W, Output Current=50mA, Output Current per Channel=25mA, Power Supply Rejection Ratio (PSRR)=70dB, Common Mode Rejection Ratio=66dB, Contact Plating=Tin, Country of Assembly=Thailand, Country of Fabrication="United States of America", Country of Origin=Thailand, Export Control Classification Number (ECCN) Code=EAR99, Harmonized Tariff Schedule (HTS) Code=8542.33.0001, Height=1.3mm, HS Code=8542.33.0001, Hysteresis=5mV, Introduction Date=2009-03-10, Lead Free="Lead Free", Length=3.1mm, Lifecycle Status=Production, Max Input Current=1pA, Mounting Technology="Surface Mount", Nominal Supply Current=130µA, Number of Channels=1, Number of Elements=1, Output Type=TTL, Packaging="Cut Tape", Pins=5, Projected EOL Date=2034-03-10, Propagation Delay=80ns, Quiescent Current=130µA, Radiation Hardening=No, REACH SVHC=Unaffected, Response Time=49ns, RoHS=Compliant, Schedule B="8542330000, 8542330000", Turn-On Delay Time=49ns, TYPE="General Purpose", Width=1.8mm
U6: library part CMP-014-00003-4, "MCP6021 Series 5.5 V 10 MHz Rail-to-Rail I/O Operational Amplifier- SOT-23-5", Case/Package=SOT-23, Clock Frequency=10kHz, Frequency=10Hz, Input Bias Current=1pA, Input Offset Voltage (Vos)=250µV, Manufacturer Lifecycle Status=REL, Max Operating Temperature=125°C, Max Supply Voltage=5.5V, Min Input Voltage=2.5V, Min Operating Temperature=-40°C, Nominal Supply Current=1mA, Output Current=22mA, Output Current per Channel=30mA, Power Supply Rejection Ratio (PSRR)=74dB, Voltage Gain=110dB, Bandwidth=10MHz, Common Mode Rejection Ratio=70dB, Contact Plating=Tin, Country of Assembly=Thailand, Country of Fabrication="United States of America", Country of Origin=Thailand, Export Control Classification Number (ECCN) Code=EAR99, Gain Bandwidth Product=10MHz, Harmonized Tariff Schedule (HTS) Code=8542.33.0001, Height=1.2954mm, HS Code=8542.33.0001, Introduction Date=2006-03-28, Lead Free="Lead Free", Length=3.0988mm, Lifecycle Status=Production, Min Supply Voltage=2.5V, Mounting Technology="Surface Mount", Number of Amplifiers=1, Number of Channels=1, Number of Circuits=1, Number of Elements=1, Operating Supply Current=1mA, Pins=5, Projected EOL Date=2034-03-28, Radiation Hardening=No, REACH SVHC=Unaffected, RoHS=Compliant, Schedule B="8542330000, 8542330000", Settling Time=250ns, Slew Rate=7V/µs, Width=1.8034mm
U7: library part CMP-00024-00006-2, "MOSFET Driver 500 Volt 3.3A 1 Output Hi/Lo Side Non Input Volt 8-Pin PDIP", Ambient Temperature Range High=125°C, Case/Package=DIP, Max Junction Temperature (Tj)=150°C, Max Output current=3.3A, Max Output Voltage=18V, Max Power Dissipation=1W, Max Supply Current=1.2mA, Min Operating Temperature=-40°C, Min Output Voltage=12V, Min Supply Voltage=0V, Nominal Supply Voltage (DC)=15V, Output Current=1.6A, Output Voltage=518V, Package Quantity=3000, Reference Voltage=500V, Temperature Grade=Automotive, Channel Type=Single, Export Control Classification Number (ECCN) Code=EAR99, Fall Time=26ns, Harmonized Tariff Schedule (HTS) Code=8542.39.00.60, Height=5.33mm, Height - Seated (Max)=5.33mm, Introduction Date=1991-03-01, Lead Free="Contains Lead", Length=9.88mm, Lifecycle Status=Production, LTB Date=2013-10-03, LTD Date=2014-04-03, Max Operating Temperature=125°C, Max Supply Voltage=18V, Mounting Technology="Through Hole", Nominal Supply Current=1.2mA, Number of Channels=1, Number of Circuits=1, Number of Drivers=1, Number of Outputs=1, Number of Terminals=8, Operating Supply Voltage=15V, Pins=8, Power Dissipation=1W, Propagation Delay=370ns, Radiation Hardening=No, REACH SVHC=Unaffected, Rise Time=43ns, RoHS=Compliant, Schedule B="8542310000, 8542310000", Terminal Pitch=2.54mm, Turn-Off Delay Time=200ns, Turn-On Delay Time=170ns, TYPE="Integrated Circuit (IC)", Width=7.62mm

## Via types
v1: diameter 0.508, hole 0.254, Top Layer to Bottom Layer, tented both sides, 11 vias

## Nets (pads, with @x,y where several pads share a name; then routed paths per layer and width w, separated by ;. In a path a pad name is that pad's centre, name@x,y a point inside that pad or via, vN(x,y) a via of type N, cw(c..) or ccw(c..) an arc to the next point about the centre after c; other vN are vias at no path point)
+5V: C2.1 C8.1 C9.1 R9.1 U1.1 U3.2 U4.4 U4.8 U5.5 U6.5 | length 22.4
  Top Layer w0.5: U4.8 v1(70.266,9.039) ; v1(71.247,12.849) U4.4 ; R9.1 81.79,4.868 81.889,4.769 ; v1(80.264,3.099) 81.885,3.099 C9.1 81.889,4.769 ; U6.5@81.889,6.417 81.889,4.769
  Top Layer w0.65: v1(87.035,3.099) 87.036,3.1 88.538,3.1 C8.1 88.537,3.105 88.537,6.049 U5.5
  Top Layer w0.8: v1(30.795,2.496) 30.795,3.893 C2.1 30.795,3.912 30.795,6.398 U3.2@30.804,6.407
  Layer 2 w1: 73.342,3.582 U1.1
+12V: C4.1 C5.1 C13.1 D1.2 U2.2 U3.1 U7.1 | length 40.1
  Top Layer w0.7: D1.2 72.016,26.518 73.762,28.263 C13.1 ; U7.1 70.864,30.848 70.864,30.86 70.877,30.873 C13.1 ; v1(75.663,30.873) C13.1
  Top Layer w0.8: C4.1@23.982,6.803 23.953,6.832 23.22,6.832 22.055,7.996 22.055,17.221 23.579,18.745 v1(30.879,18.745) C5.1 ; C4.1 24.013,6.774 26.194,6.774 26.244,6.724 U3.1 ; C5.1@30.879,20.171 30.933,20.225 30.933,23.032 U2.2
ERR: C1.2 C6.2 J4.1 R5.2 U5.3 U6.1 | length 31.5
  Top Layer w0.254: C1.2@82.398,11.75 82.169,11.979 82.169,13.426 ; J4.1 83.057,21.184 82.169,20.296 82.169,13.426 ; U6.1 84.706,6.563 85.514,6.563 87.794,8.844 87.794,10.173 89.128,10.173 ; U5.3 R5.2 90.893,10.173 89.128,10.173 ; 82.169,13.426 88.979,13.426 89.128,13.277 89.128,10.173
GND: C2.2 C3.2 C4.2 C5.2 C7.2 C8.2 C9.2 C11.2 C12.2 C13.2 C14.2 C16.2 D2.2 D3.2 J2.2 J2.3 J2.4 J6.1 J7.2 J7.MP1 J7.MP2 R6.2 R8.1 R10.2 U2.3 U3.3 U4.1 U5.2 U6.2 U7.4
  other v1: 83.363,12.548 84.125,12.548 84.887,12.548 85.649,12.548
NetC1_1: C1.1 C10.2 R2.1 R4.2 R6.1 U6.4
NetC6_1: C6.1 R2.2 | length 2.2
  Top Layer w0.254: R2.2 85.943,11.65 C6.1@87.618,11.65 ; C6.1@87.618,11.65 87.794,11.827 C6.1@87.618,11.65
NetC10_1: C10.1 R3.2 | length 2.5
  Top Layer w0.254: R3.2@76.479,10.43 76.622,10.573 77.004,10.573 77.863,11.432 78.343,11.432 C10.1@78.511,11.6
NetC15_1: C15.1 D1.1 U7.8 | length 15.2
  Top Layer w0.5: C15.1 60.957,35.587 61.569,34.976 64.008,34.976 64.313,34.671 64.313,32.512 U7.8 64.956,29.136 64.956,27.347 D1.1
NetC15_2: C15.2 D3.1 L1.1 Q1.2 U7.5 U7.6 | length 17.6
  Top Layer w0.5: Q1.2 52.156,33.303 52.449,33.01 54.118,33.01 59.761,38.654 60.751,38.654 60.807,38.71 62.89,38.71 U7.5 U7.6
NetD2_1: D2.1 R5.1 | length 5.9
  Top Layer w0.254: D2.1 90.285,15.9 90.679,15.506 90.679,11.868 R5.1
NetQ1_1: Q1.1 R7.2 | length 10.9
  Top Layer w0.5: Q1.1 52.156,31.76 52.652,32.256 54.764,32.256 58.719,36.211 59.357,36.211 R7.2
NetR1_2: R1.2 U1.2 | length 8.7
  Top Layer w0.254: R1.2 66.103,5.457 66.674,4.886 69.271,4.886 U1.2
NetR7_1: R7.1 U7.7 | length 4
  Top Layer w0.5: R7.1 60.613,34.836 61.692,33.758 62.875,33.758 U7.7
NetR8_2: R8.2 U7.3 | length 3.1
  Top Layer w0.7: U7.3 70.641,36.151 R8.2
NetR11_1: R11.1 U5.1 | length 12.9
  Top Layer w0.254: U5.1 91.805,6.053 92.227,6.475 R11.1@92.227,17.864
PWM: J3.1 R11.2 U7.2 | length 47.3
  Top Layer w0.254: U7.2 74.427,33.686 80.086,39.345 91.723,39.345 92.227,38.84 92.227,21.184 ; J3.1@88.824,21.26 J3.1 92.202,21.209 92.227,21.184 ; R11.2@92.227,19.264 92.227,21.184
Ramp: C7.1 J1.1 R1.1 U1.3 U4.2 U4.6 U4.7 U5.4 | length 53.1
  Top Layer w0.254: R1.1 67.243,9.969 67.583,10.309 U4.7 ; C7.1 66.173,11.579 U4.6 U4.7 ; U1.3 69.797,7.953 70.973,7.953 71.122,8.101 71.122,10.214 71.217,10.309 ; J1.1 74.077,15.189 74.965,14.301 74.965,10.35 ; U5.4 88.345,7.764 87.816,7.764 86.254,6.202 86.254,1.429 85.809,0.984 75.114,0.984 74.965,1.132 74.965,10.35 ; U4.7 71.122,10.309 71.217,10.309 ; 71.217,10.309 U4.2 74.924,10.309 74.965,10.35
Vin: C3.1 C11.1 C12.1 J2.1 Q1.3 U2.1 | length 58.6
  Top Layer w0.8: C11.1 10.414,22.584 C11.1@11.764,21.234 ; C11.1@10.79,22.98 18.241,22.98 18.267,22.954 21.107,22.954 ; U2.1@25.857,22.936 25.8,22.936 25.782,22.954 C3.1 21.107,22.954 ; 45.628,38.964 21.576,38.964 21.107,38.495 21.107,22.954
Vout: C16.1 J5.1 J7.1 L1.2 R3.1 R4.1 | length 43.7
  Top Layer w0.7: C16.1 76.479,23.462 ; R3.1 76.479,13.665 ; R4.1 80.419,11.675 80.419,13.255 80.009,13.665 76.479,13.665 ; J7.1 88.148,29.725 88.748,29.125 J5.1 78.706,25.629 76.54,23.462 76.479,23.462 ; 76.479,13.665 76.479,23.462
Vref: C14.1 R9.2 R10.1 U6.3 | length 10.7
  Top Layer w0.254: R9.2 78.137,5.617 78.286,5.766 79.24,5.766 79.389,5.915 79.389,6.644 R10.1 79.437,8.336 C14.1@79.437,8.456 ; C14.1 C14.1@79.437,8.456 ; U6.3 84.452,8.209 83.66,8.209 82.837,7.386 80.884,7.386 80.05,8.22 79.673,8.22 C14.1@79.437,8.456
pads on no net: U4.3 U4.5

## Polygon pours and split planes (outlines as drawn)
GND on Top Layer "GND_L01_P008" (solid, remove dead copper, pour order 20): 0,39.497 0,2.007 ccw(c2.007,2.007) 2.007,0 91.186,0 ccw(c91.186,2.032) 93.218,2.032 93.218,39.243 ccw(c91.186,39.243) 91.186,41.275 1.778,41.275 ccw(c1.778,39.497)
Vin on Top Layer "VIN_L01_P015" (solid, remove dead copper, pour order 15): 17.845,4.191 6.756,4.191 3.708,7.239 3.708,25.324 5.588,27.203 12.167,27.203 12.167,24.839 12.167,20.766 8.65,20.766 7.95,20.066 7.95,15.074 14.896,8.128 17.907,8.128 18.339,7.696 18.339,4.685
Vin on Top Layer "VIN_L01_P017" (solid, pour order 17): 43.739,36.617 50.957,36.617 51.267,36.927 51.267,39.919 51.054,40.132 43.946,40.132 43.739,39.925
NetC1_1 on Top Layer "NETC1_1_L01_P005" (solid, remove dead copper, pour order 5): 86.716,10.81 77.908,10.81 77.908,9.365 80.309,9.365 80.884,8.79 80.884,8.135 81.066,7.953 82.825,7.953 82.947,8.075 82.947,9.59 83.233,9.876 86.684,9.876 86.824,10.016 86.824,10.702
Vout on Top Layer "VOUT_L01_P013" (solid, remove dead copper, pour order 13): 45.843,0.563 54.512,0.563 55.753,1.803 55.753,9.827 69.032,23.106 70.566,23.106 70.566,23.825 62.427,23.825 53.916,15.189 46.476,15.189 44.78,13.494 44.78,1.626
NetC15_2 on Top Layer "NETC15_2_L01_P012" (solid, remove dead copper, pour order 12): 53.988,36.093 47.056,36.093 46.013,35.05 46.013,17.678 46.8,16.891 53.727,16.891 54.512,17.676 54.512,22.661 55.601,23.749 59.969,23.749 60.473,24.253 60.473,26.064 59.969,26.568 49.319,26.568 48.209,27.678 48.209,31.935 50.285,34.011 53.988,34.011
GND on Layer 2 "GND_L01_P008" (solid, remove dead copper, pour order 18): 0,39.497 0,2.007 ccw(c2.007,2.007) 2.007,0 91.186,0 ccw(c91.186,2.032) 93.218,2.032 93.218,39.243 ccw(c91.186,39.243) 91.186,41.275 1.778,41.275 ccw(c1.778,39.497)
+5V on Layer 2 "+5V_L03_P016" (solid, remove dead copper, pour order 16): 64.897,3.912 67.361,3.912 67.361,8.077 67.793,8.509 70.256,8.509 70.714,8.966 70.714,10.49 72.338,12.115 74.243,12.115 74.524,12.395 74.524,13.005 74.219,13.31 65.456,13.31 64.897,12.751
+5V on Layer 2 "+5V_L03_P011" (solid, remove dead copper, pour order 11): 89.629,3.912 30.593,3.912 29.921,3.24 29.921,1.156 30.642,0.436 89.675,0.436 90.119,0.88 90.119,3.422
+12V on Layer 2 "+12V_L03_P014" (solid, remove dead copper, pour order 14): 29.769,17.628 30.175,17.221 73.477,17.221 76.53,20.275 76.53,31.217 76.048,31.699 74.727,31.699 74.244,31.217 74.244,27.509 69.396,22.661 30.23,22.661 29.769,22.2
GND on Layer 1 "GND_L01_P008" (solid, remove dead copper, pour order 8): 0,39.497 0,2.007 ccw(c2.007,2.007) 2.007,0 91.186,0 ccw(c91.186,2.032) 93.218,2.032 93.218,39.243 ccw(c91.186,39.243) 91.186,41.275 1.778,41.275 ccw(c1.778,39.497)
GND on Bottom Layer "GND_L01_P008" (solid, remove dead copper, pour order 19): 0,39.497 0,2.007 ccw(c2.007,2.007) 2.007,0 91.186,0 ccw(c91.186,2.032) 93.218,2.032 93.218,39.243 ccw(c91.186,39.243) 91.186,41.275 1.778,41.275 ccw(c1.778,39.497)

## Silkscreen, mask and mechanical layers (free items; w line width, h text height)
Top Overlay:
  text "GND" at 87.757,38.96 h0.84
  text "12V Reg" at 23.778,38.386 h1.5
  text "SW  / Node" at 53.374,36.576 h1.5
  text "VOUT" at 87.251,23.129 h0.84
  text "PWM" at 87.697,18.709 h0.84
  text "ERROR" at 81.701,18.684 h0.84
  text "RAMP" at 71.675,16.922 h0.84
  text "5V Reg" at 24.649,16.572 h1.5
  text "Vin" at 18.483,5.337 h1.5

## Text inside footprints (layer, text, board x,y; h text height)
C11: Top Overlay "+" at 9.914,20.425 h1.22 r270
D2: Top Assembly "*" at 88.78,16.535 h1.27 r180
U6: Top Assembly "*" at 84.199,7.021 h1.27 r180
U7: Top Assembly "*" at 70.376,31.781 h1.27 r180